# Altium PCB pcb_of_servo_pwd.PcbDoc
Units mm, origin at the board's own origin, x right, y up, seen from the top; angles counter-clockwise.
Board outline 152.4 x 101.6 mm, 2 copper layers (Top Layer, Bottom Layer); 6 components, 72 nets, 15 pads, 0 vias.
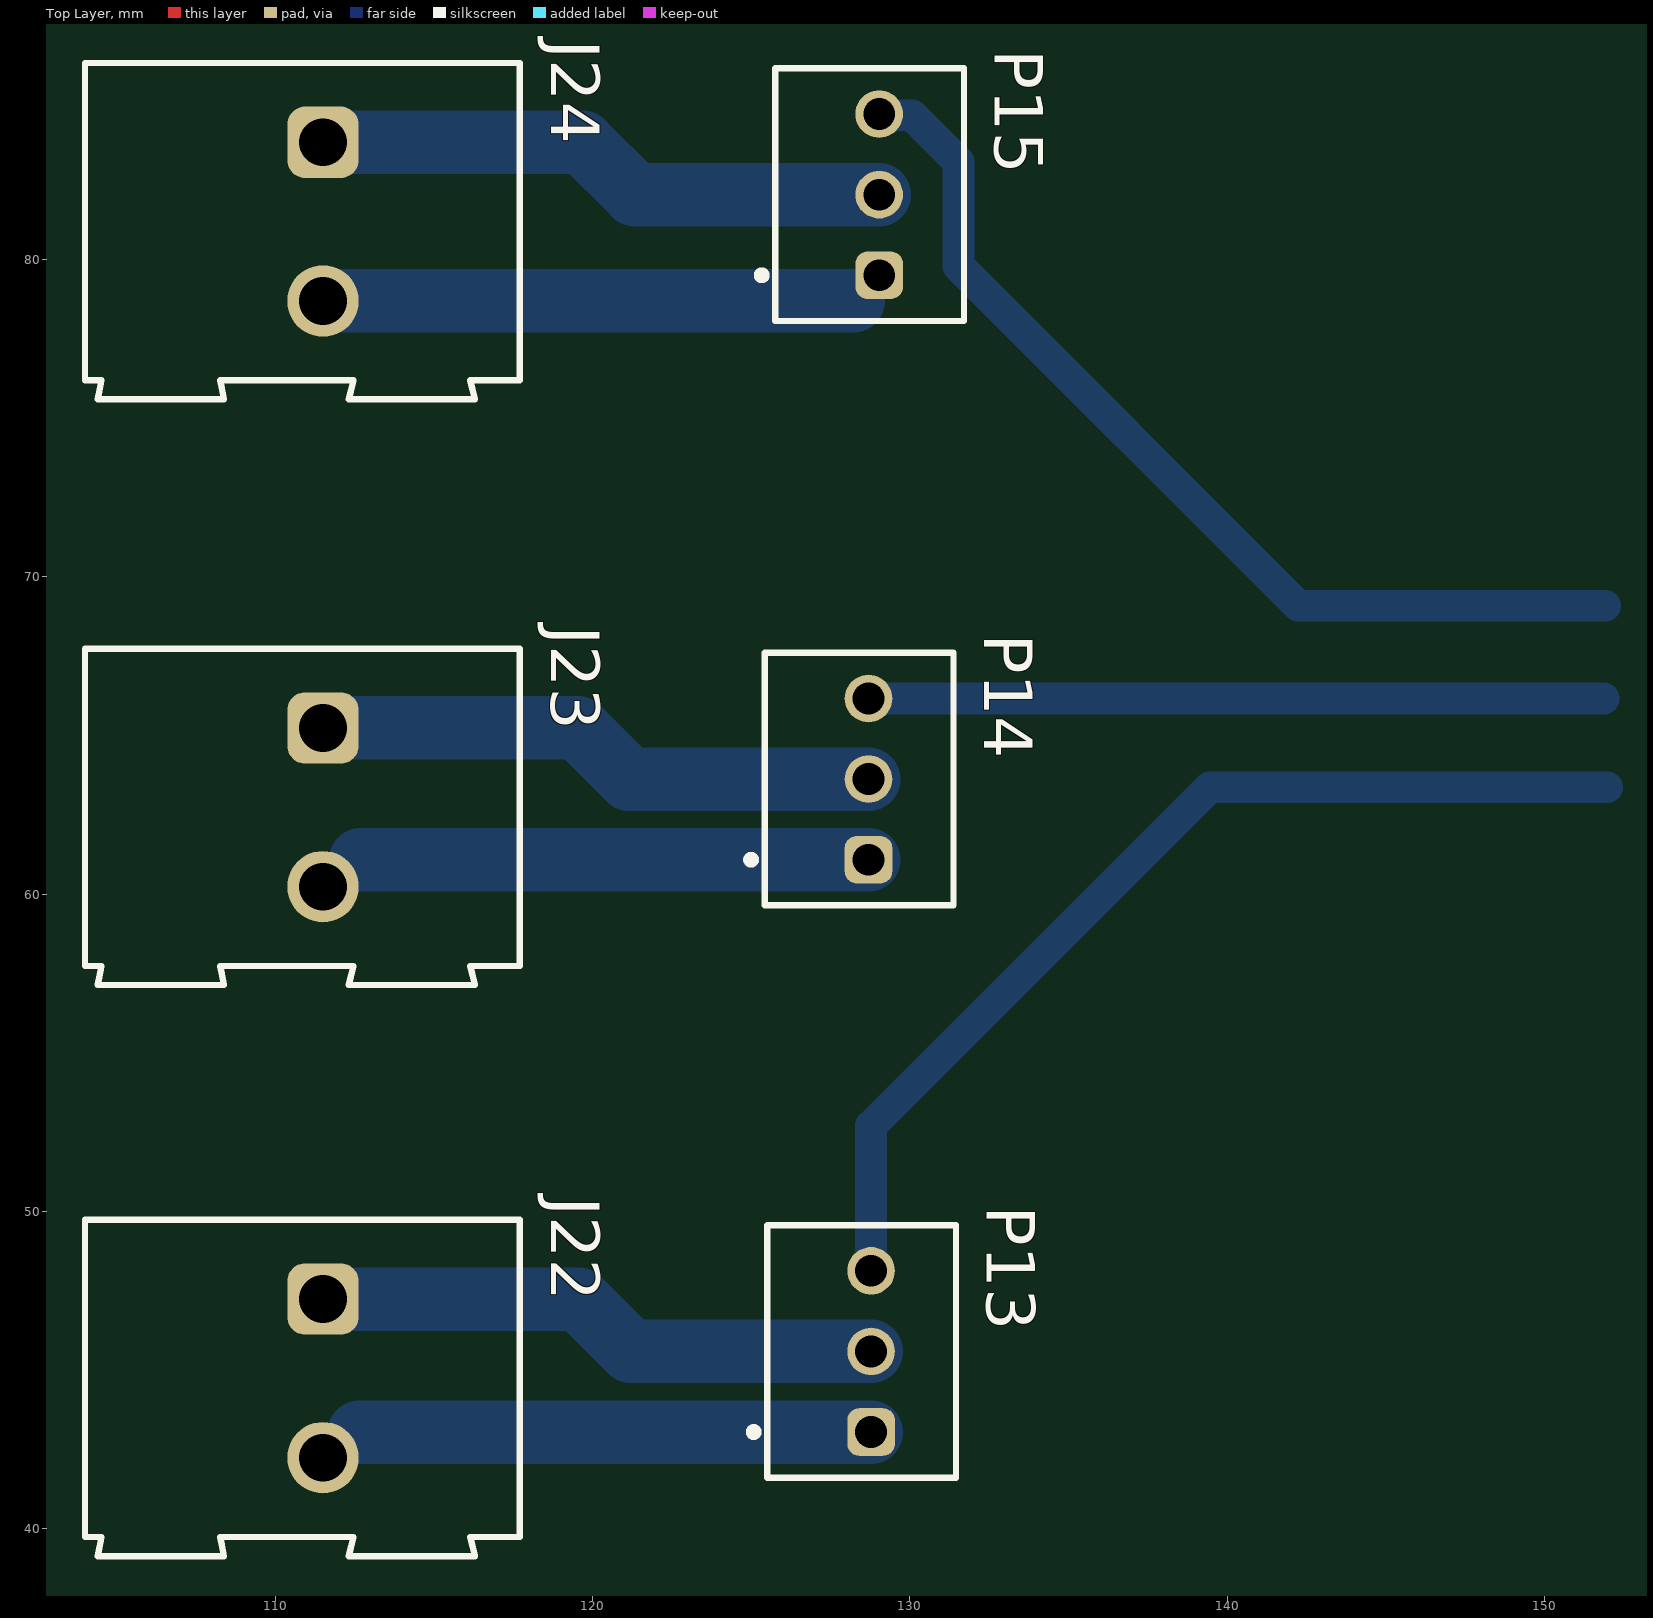
[diagram p0: Top Layer view]
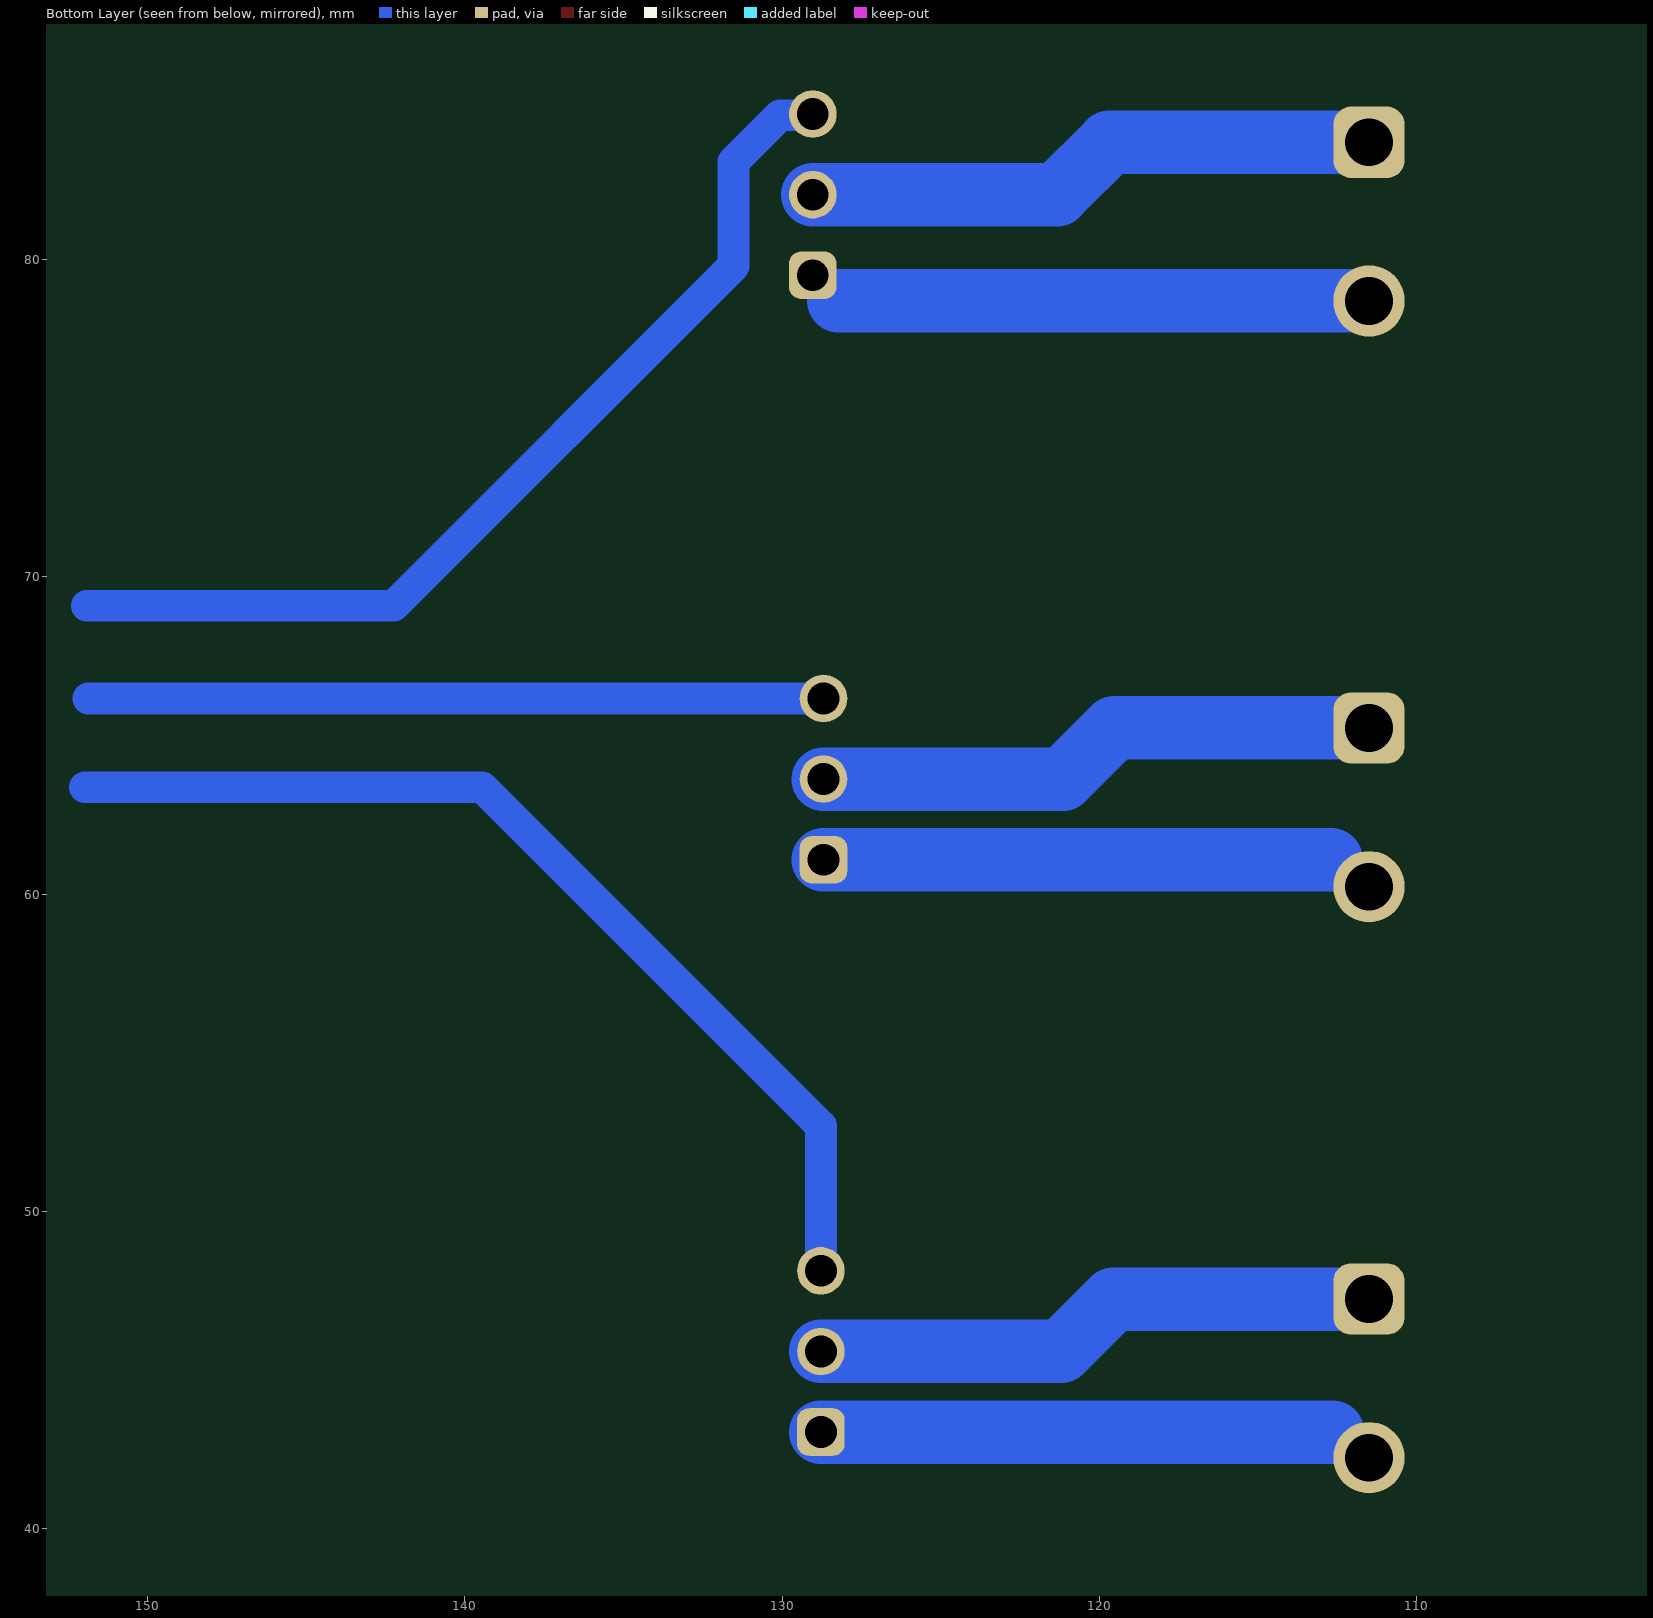
[diagram p1: Bottom Layer view, seen from below]
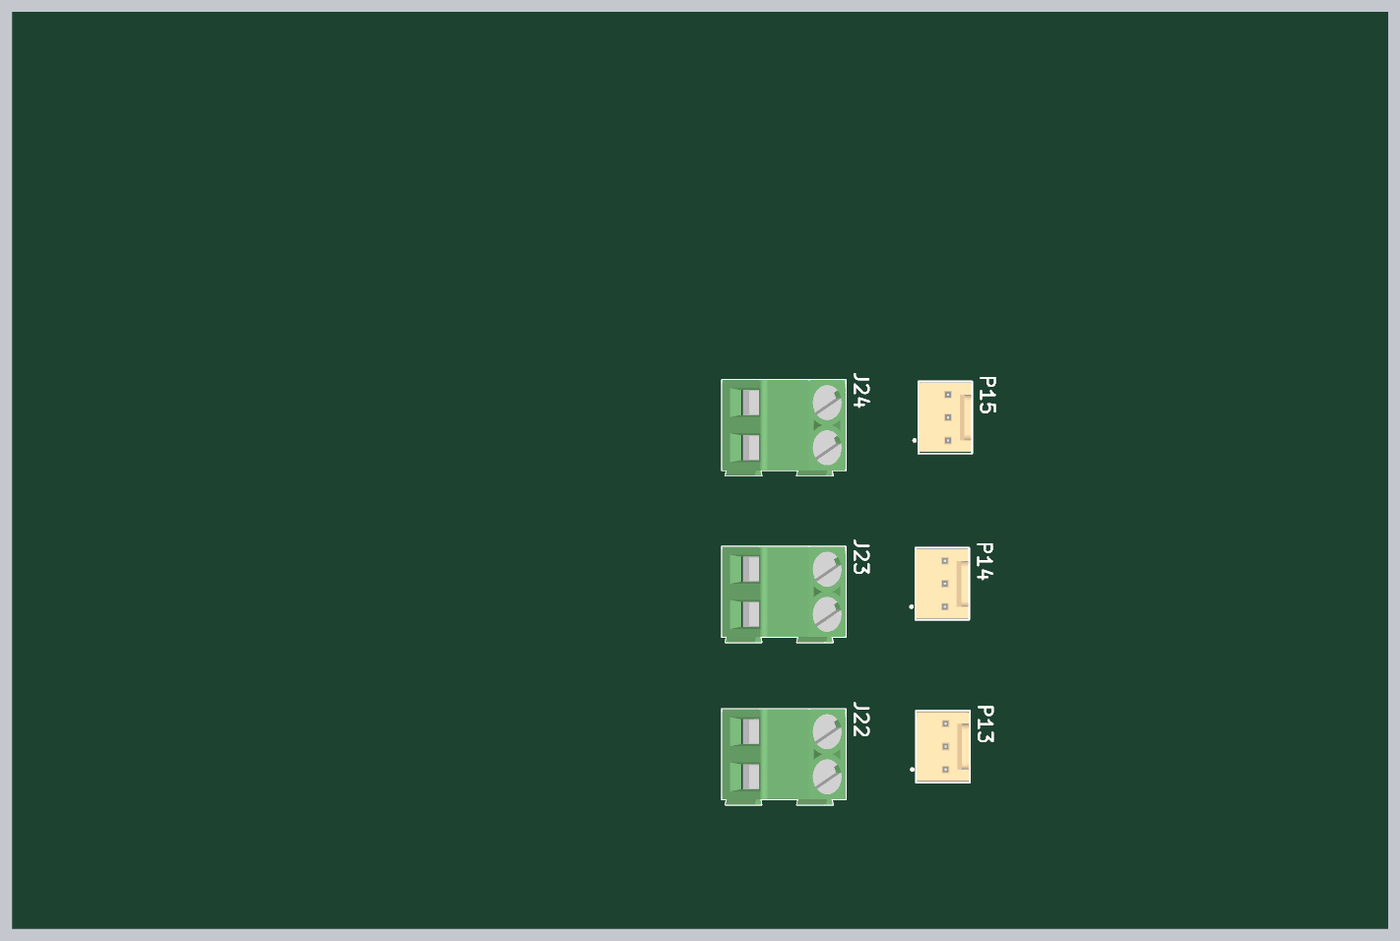
[diagram p2: 3D render of the assembled board from above, using the file's embedded part models]

## Layer stack, top to bottom
Top Solder: solder mask 0.0102, Solder Resist, Dk 3.5
Top Layer: signal copper 0.0356
Dielectric 1: dielectric 0.32, FR-4, Dk 4.8
Bottom Layer: signal copper 0.0356
Bottom Solder: solder mask 0.0102, Solder Resist, Dk 3.5

## Board outline
25.4,25.4 177.8,25.4 177.8,127 25.4,127

## Design rules (kind name [scope] priority, off if disabled: settings)
Clearance [All] p1: gap=1 ignorepadtopadclearanceinfootprint=FALSE
PlaneClearance [All] p1: clearance=1
PlaneConnect [All] p1: planeconnectstyle=Relief reliefexpansion=1 reliefentries=4 reliefconductorwidth=1 reliefairgap=1
PolygonConnect [All] p1: connectstyle=Relief reliefconductorwidth=1 reliefentries=4 polygonreliefangle="90 Angle" airgapwidth=1
RoutingCorners [All] p1: cornerstyle=45-Degree minsetback=1 maxsetback=1
RoutingVias [All] p1: holewidth=0.711 width=1.27 viastyle="Through Hole" minholewidth=0.711 minwidth=1.27 maxholewidth=0.711 maxwidth=1.27
SolderMaskExpansion [All] p1: expansion=0 istentingtop=FALSE
SupplyNets "Schematic Supply Nets_1" [InNet('GND')] p1: voltage=0.000
SupplyNets "Schematic Supply Nets" [InNet('VCC')] p2: voltage=0.000
Width [All] p1: maxlimit=1.5 minlimit=0.5 preferedwidth=1
27 further rules are at their usual default settings.

## Classes and differential pairs
component class schematic_of_pcb_for_stm: J22 P14 U?

## Components (designator, comment, footprint, x,y, rotation, side; value= is the part's Value field where it differs from the comment)
J22 "691211720002" 691211720002 110.856,44.744 r270 top
J23 "691211720002" 691211720002 110.856,62.738 r270 top
J24 "691211720002" 691211720002 110.856,81.193 r270 top
P13 "61900311121" 61900311121 128.478,45.593 r270 top
P14 "61900311121" 61900311121 128.397,63.627 r270 top
P15 "61900311121" 61900311121 128.732,82.042 r270 top

## Footprints (in the part's own frame and the unit in brackets; to place one, negate y for a bottom-side part, rotate by r counter-clockwise, add the part's x,y. Pads: shape width x height; smd on the part's side, far side on the other; paste and mask are expansions set on the pad)
61900311121 [mm] "2.54mm Male Locking Header, 3p"
  rrect50% 1.5x1.5 hole 1: 1(2.54,0.3)
  round 1.5 hole 1: 2(0,0.3) 3(-2.54,0.3)
  silkscreen extent -3.98,-3.52 3.98,2.98, body extent -3.81,-2.9 3.81,2.9, height 11.53
691211720002 [mm] "5,00mm - modular - green -45¡ã entry with rising cage clamp - 02p"
  rrect50% 2.25x2.25 hole 1.5: 1(-2.5,0.65)
  round 2.25 hole 1.5: 2(2.5,0.65)
  silkscreen extent -5,-6.85 5.6,6.85, body extent -5,-6.85 5.6,6.85, height 15.72

## Part data
J22 J23 J24: library part CMP-1502-02524-3, "211 Series 5MM Pitch Straight, Pcb Terminal Block, Through Hole, 2 Way", Color=Green, Current=10A, Max Operating Temperature=105°C, Min Operating Temperature=-40°C, Voltage=300V, Connector Type="PCB, Terminal Block", Contact Material=Brass, Contact Plating=Tin, Height=15.5mm, Housing Material=Nylon, Lead Pitch=5mm, Length=13.7mm, Mount="Through Hole", Number of Contacts=2, Number of Levels=1, Number of Pins=2, Number of Positions Per Level=2, Packaging=Box, Pitch=5.0038mm, Plating="Brass, Steel", REACH SVHC=Unknown, RoHS=Compliant, Stripping Length=-7mm, Termination=Screw, Width=10mm, Wire Gauge (Max)=24AWG, Wire Gauge (Min)=12AWG, Wire/Cable Gauge=12AWG
P13 P14 P15: library part CMP-1502-00585-3, "Wr-wtb Series, 2.54MM Pitch 3 Way 1 Row Straight Pcb Header, Through Hole", Color=Beige, Contact Resistance=20mΩ, Current Rating=3A, Flammability Rating="UL94 V-0", Insulation Resistance=1GΩ, Max Operating Temperature=105°C, Min Operating Temperature=-40°C, Operating Supply Voltage=250V, Connector Type="Male Pin", Contact Gender=Male, Contact Material=Copper, Contact Mating Length=7.493mm, Contact Plating=Tin, Fastening Type=Friction, Gender=Male, Height=12.5mm, Housing Material=Nylon, Lead Pitch=2.54mm, Length=7.62mm, Mount="Through Hole", Number of Contacts=3, Number of Pins=3, Number of Positions=3, Number of Rows=1, Orientation=Vertical, Packaging=Bulk, Pitch=2.54mm, RoHS=Compliant, Termination="Through Hole", Voltage Rating=250V, Width=7.66mm

## Nets (pads, with @x,y where several pads share a name; then routed paths per layer and width w, separated by ;. In a path a pad name is that pad's centre, name@x,y a point inside that pad or via, vN(x,y) a via of type N, cw(c..) or ccw(c..) an arc to the next point about the centre after c; other vN are vias at no path point)
e1_ch1: 
e1_ch2: 
e2_ch1: 
e2_ch2: 
e3_ch1: 
e3_ch2: 
e4_ch1: 
e4_ch2: 
e5_ch1: 
e5_ch2: 
E5V: 
e6_ch1: 
e6_ch2: 
e56_ch2: 
esp_pwr: 
fl_dir: 
fl_pwm: 
fr_dir: 
fr_pwm: 
front_rack_pwm: 
GND: 
imu_pwr: 
NetDS?_1: 
NetDS?_2: 
NetJ22_1: J22.1 P13.2 | length 18
  Bottom Layer w2: J22.1 119.559,47.244 121.21,45.593 P13.2
NetJ22_2: J22.2 P13.1 | length 17.6
  Bottom Layer w1: J22.2 111.844,42.244 112.653,43.053
  Bottom Layer w2: 112.653,43.053 P13.1
NetJ23_1: J23.1 P14.2 | length 17.9
  Bottom Layer w2: J23.1 119.538,65.238 121.149,63.627 P14.2
NetJ23_2: J23.2 P14.1 | length 17.5
  Bottom Layer w1: J23.2 111.844,60.238 112.693,61.087
  Bottom Layer w2: 112.693,61.087 P14.1
NetJ24_1: J24.1 P15.2 | length 18.2
  Bottom Layer w2: J24.1 119.686,83.693 121.337,82.042 P15.2
NetJ24_2: J24.2 P15.1 | length 17.9
  Bottom Layer w1: 128.223,78.693 P15.1
  Bottom Layer w2: J24.2 128.223,78.693
NetJ?_1: 
NetJ?_2: 
pnuematic1: 
pnuematic2: 
pnuematic3: 
pnuematic_out_1: 
pnuematic_out_2: 
pnuematic_out_3: 
pnuematic_out_4: 
pnuematic_out_5: 
pnuemtaic4: 
pnuemtaic5: 
prox_bd: 
prox_bf: 
prox_fd: 
prox_ff: 
prox_mdl: 
prox_mdr: 
prox_mf: 
rack_front_left_dir: 
rack_front_right_dir: 
rack_rear_left_dir: 
rack_rear_right_dir: 
rear_rack_pwm: 
rl_dir: 
rl_pwm: 
rr_dir: 
rr_pwm: 
S5V: 
SCL_esp: 
scl_imu: 
sda_imu: 
servo1_pwm: 
servo2_pwm: 
servo3_pwm: 
Stm_power: 
USART_RX: 
USART_TX: 
VCC: 
wire1: P13.3 | length 32.2
  Bottom Layer w1: P13.3 128.778,52.705 139.446,63.373 151.968,63.373
wire2: P14.3 | length 23.2
  Bottom Layer w1: P14.3 151.867,66.167
wire3: P15.3 | length 31.2
  Bottom Layer w1: P15.3 129.072,84.542 130.068,84.542 131.532,83.078 131.532,79.796 142.24,69.088 151.913,69.088